# Altium PCB LDO-PCB.PcbDoc
Units mm, origin at the board's own origin, x right, y up, seen from the top; angles counter-clockwise.
Board outline 25.5 x 9 mm, 2 copper layers (Top Layer, Bottom Layer); 5 components, 3 nets, 17 pads, 4 vias.
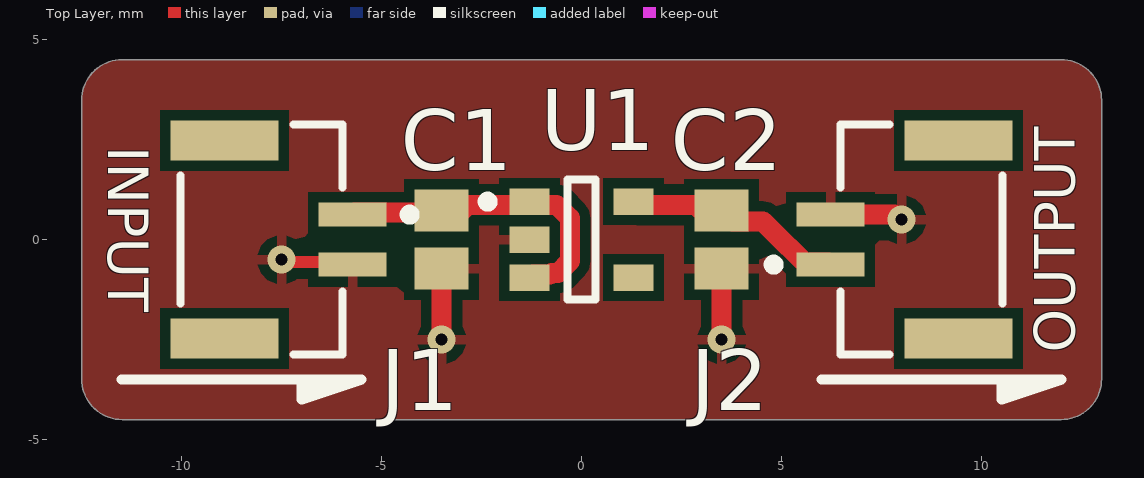
[diagram p0: Top Layer view]
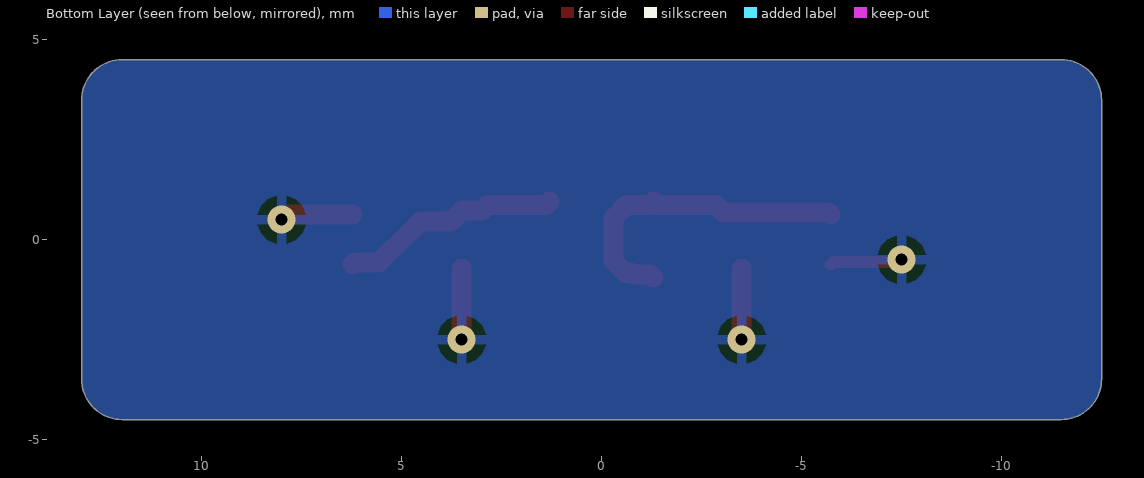
[diagram p1: Bottom Layer view, seen from below]
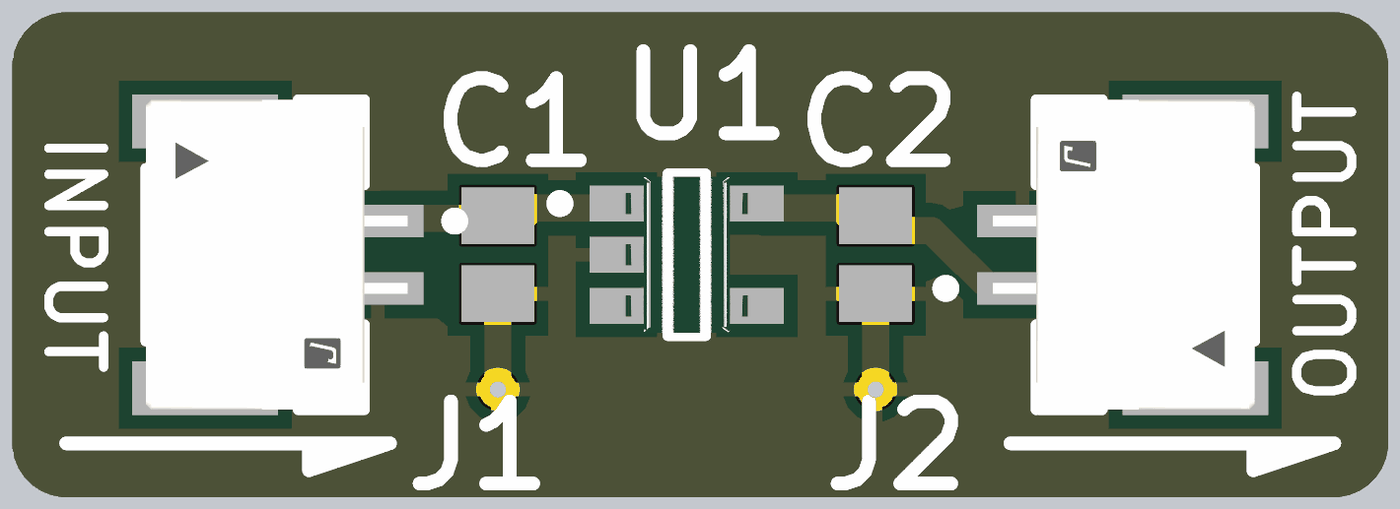
[diagram p2: 3D render of the assembled board from above, using the file's embedded part models]

## Layer stack, top to bottom
Top Solder: solder mask 0.0102, Solder Resist, Dk 3.5
Top Layer: signal copper 0.0356
Dielectric 1: dielectric 0.32, FR-4, Dk 4.8
Bottom Layer: signal copper 0.0356
Bottom Solder: solder mask 0.0102, Solder Resist, Dk 3.5

## Board outline
-12.5,-3.484 -12.5,3.484 cw(c-11.484,3.484) -11.484,4.5 11.984,4.5 cw(c11.984,3.484) 13,3.484 13,-3.484 cw(c11.984,-3.484) 11.984,-4.5 -11.484,-4.5 cw(c-11.484,-3.484)

## Design rules (kind name [scope] priority, off if disabled: settings)
Clearance Clearance_1 [InNamedPolygon('Top_Ground')] p1: gap=0.254 ignorepadtopadclearanceinfootprint=FALSE
Clearance [All] p2: gap=0.254 ignorepadtopadclearanceinfootprint=FALSE
PolygonConnect [All] p1: connectstyle=Relief reliefconductorwidth=0.254 reliefentries=4 polygonreliefangle="90 Angle" airgapwidth=0.254
RoutingVias [All] p1: holewidth=0.711 width=1.27 viastyle="Through Hole" minholewidth=0.711 minwidth=1.27 maxholewidth=0.711 maxwidth=1.27
SolderMaskExpansion [All] p1: expansion=0.051 istentingtop=FALSE
SupplyNets "Schematic Supply Nets_2" [InNet('+5V')] p1: voltage=0.000
SupplyNets "Schematic Supply Nets_1" [InNet('GND')] p2: voltage=0.000
SupplyNets "Schematic Supply Nets" [InNet('+3V3')] p3: voltage=0.000
Width [All] p1: maxlimit=0.5 minlimit=0.254 preferedwidth=0.3
30 further rules are at their usual default settings.

## Components (designator, comment, footprint, x,y, rotation, side; value= is the part's Value field where it differs from the comment)
C1 "1uF" CAPC2013X145X50LL20T20 -3.5,0 r90 top
C2 "1uF" CAPC2013X145X50LL20T20 3.5,0 r90 top
J1 "SM02B-GHS-TB(LF)(SN)" FP-SM02B-GHS-TB_LF_SN-MFG -8,0 r270 top
J2 "SM02B-GHS-TB(LF)(SN)" FP-SM02B-GHS-TB_LF_SN-MFG 8.5,0 r90 top
U1 "MIC5317-3.3YM5-TR" FP-SOT23-5LD-PL-1-MFG 0,0 r0 top

## Footprints (in the part's own frame and the unit in brackets; to place one, negate y for a bottom-side part, rotate by r counter-clockwise, add the part's x,y. Pads: shape width x height; smd on the part's side, far side on the other; paste and mask are expansions set on the pad)
CAPC2013X145X50LL20T20 [mm] "Chip Capacitor, 2-Leads, Body 2.00x1.25mm, IPC High Density"
  rect 1.05x1.35 smd: 1(-0.725,0) 2(0.725,0)
  body extent -1.1,-0.72 1.1,0.72, height 1.45
FP-SM02B-GHS-TB_LF_SN-MFG [mm]
  rect 0.6x1.7 smd paste+0 mask+0: 1(-0.625,2.275) 2(0.625,2.275)
  rect 1x2.7 smd paste+0 mask+0: 3(-2.475,-0.925) 4(2.475,-0.925)
  silkscreen extent -2.88,-2.02 2.88,3.83, body extent -3.08,-2.37 3.08,3.22, height 0.25
FP-SOT23-5LD-PL-1-MFG [mm]
  rect 1x0.66 smd paste+0 mask+0: 1(-1.3,0.95) 2(-1.3,0) 3(-1.3,-0.95) 4(1.3,-0.95) 5(1.3,0.95)
  silkscreen extent -2.47,-1.5 0.35,1.5, body extent -1.9,-1.6 1.9,1.6, height 0.25

## Part data
C1 C2: library part CMP-1036-04736-2, Manufacturer=Vitramon, Part Number=VJ0805Y105JXQTW1BC
J1 J2: library part CMP-2000-07076-2, "CONN HEADER SMD R/A 2POS 1.25MM", Color=Natural, Current Rating=1A, Package Quantity=2500, Voltage Rating=50V, Connector Type="Outer Shroud Contact", Contact Material=Bronze, Contact Plating=Tin, Contact Type="Male Pin", Fastening Type=Latch, Housing Color=Natural, Housing Material=Nylon, Lead Free="Lead Free", Mount="Surface Mount", Number of Contacts=2, Number of Positions=2, Number of Rows=1, Orientation="Right Angle", Packaging="Tape and Reel", Pitch=0.049inch, Series=GH, Termination=Solder
U1: library part CMP-06324-000116-1, "IC REG LINEAR 3.3V 150MA SOT23-5", Case/Package=SOT-23-5, Dropout Voltage=155mV, Max Input Voltage=6V, Max Operating Temperature=125°C, Min Current Limit=200mA, Min Input Voltage=2.5V, Min Operating Temperature=-40°C, Output Current=150mA, Output Voltage=3.3V, Package Quantity=3000, Power Supply Rejection Ratio (PSRR)=70dB, Mount="Surface Mount", Number of Outputs=1, Number of Regulators=1, Packaging="Tape and Reel", RoHS Compliant=No, Series=-

## Via types
v1: diameter 0.7, hole 0.3, Top Layer to Bottom Layer, 4 vias

## Nets (pads, with @x,y where several pads share a name; then routed paths per layer and width w, separated by ;. In a path a pad name is that pad's centre, name@x,y a point inside that pad or via, vN(x,y) a via of type N, cw(c..) or ccw(c..) an arc to the next point about the centre after c; other vN are vias at no path point)
+3V3: C2.2 J2.1 U1.5 | length 5.6
  Top Layer w0.5: U1.5 1.38,0.87 2.855,0.87 3,0.725 C2.2 3.775,0.45 4.537,0.45 5.166,-0.179 5.179,-0.179 5.575,-0.575 6.175,-0.575 J2.1
+5V: C1.2 J1.1 U1.1 U1.3 | length 8
  Top Layer w0.5: J1.1 -5.675,0.675 -3.05,0.675 -3,0.725 -2.855,0.87 -1.38,0.87 U1.1 -1.22,0.87 -0.627,0.87 -0.296,0.539 -0.296,-0.539 -0.591,-0.834 -0.757,-0.834 -0.793,-0.87 -1.22,-0.87 U1.3
GND: C1.1 C2.1 J1.2 J2.2 U1.2 | length 7.2
  Top Layer w0.3: v1(-7.5,-0.5) -7.438,-0.563 -5.787,-0.563 J1.2
  Top Layer w0.5: v1(-3.5,-2.5) C1.1 ; v1(3.5,-2.5) C2.1 ; J2.2 7.821,0.625 7.946,0.5 v1(8,0.5)
pads on no net: J1.3 J1.4 J2.3 J2.4 U1.4

## Polygon pours and split planes (outlines as drawn)
GND on Bottom Layer "Botton_Ground" (solid, pour order 0): -12.5,-3.484 -12.5,3.484 cw(c-11.484,3.484) -11.484,4.5 11.984,4.5 cw(c11.984,3.484) 13,3.484 13,-3.484 cw(c11.984,-3.484) 11.984,-4.5 -11.484,-4.5 cw(c-11.484,-3.484)
GND on Top Layer "Top_Ground" (solid, pour order 1): -12.5,-3.484 -12.5,3.484 cw(c-11.484,3.484) -11.484,4.5 11.984,4.5 cw(c11.984,3.484) 13,3.484 13,-3.484 cw(c11.984,-3.484) 11.984,-4.5 -11.484,-4.5 cw(c-11.484,-3.484)

## Silkscreen, mask and mechanical layers (free items; w line width, h text height)
Top Overlay:
  region: 12,-3.5 10.5,-3.5 10.5,-4
  region: -5.5,-3.5 -7,-3.5 -7,-4
  lines w0.254: -11.5,-3.5 -5.5,-3.5 -7,-4 -7,-3.5 ; 6,-3.5 12,-3.5 10.5,-4 10.5,-3.5
  text "INPUT" at -11.831,2.331 h1.02 r270
  text "OUTPUT" at 12.331,-2.831 h1.02 r90
Edge Cuts:
  the board outline again, w0.254